# Altium PCB B-60-30-B.PcbDoc (part 2 of 3)
Units mm, origin at the board's own origin, x right, y up, seen from the top; angles counter-clockwise.
Board outline 70.1 x 39.1 mm, 6 copper layers (Top Layer, G1, S1, S2, G2, Bottom Layer), stack 2.011 mm thick; 241 components, 129 nets, 632 pads, 875 vias.
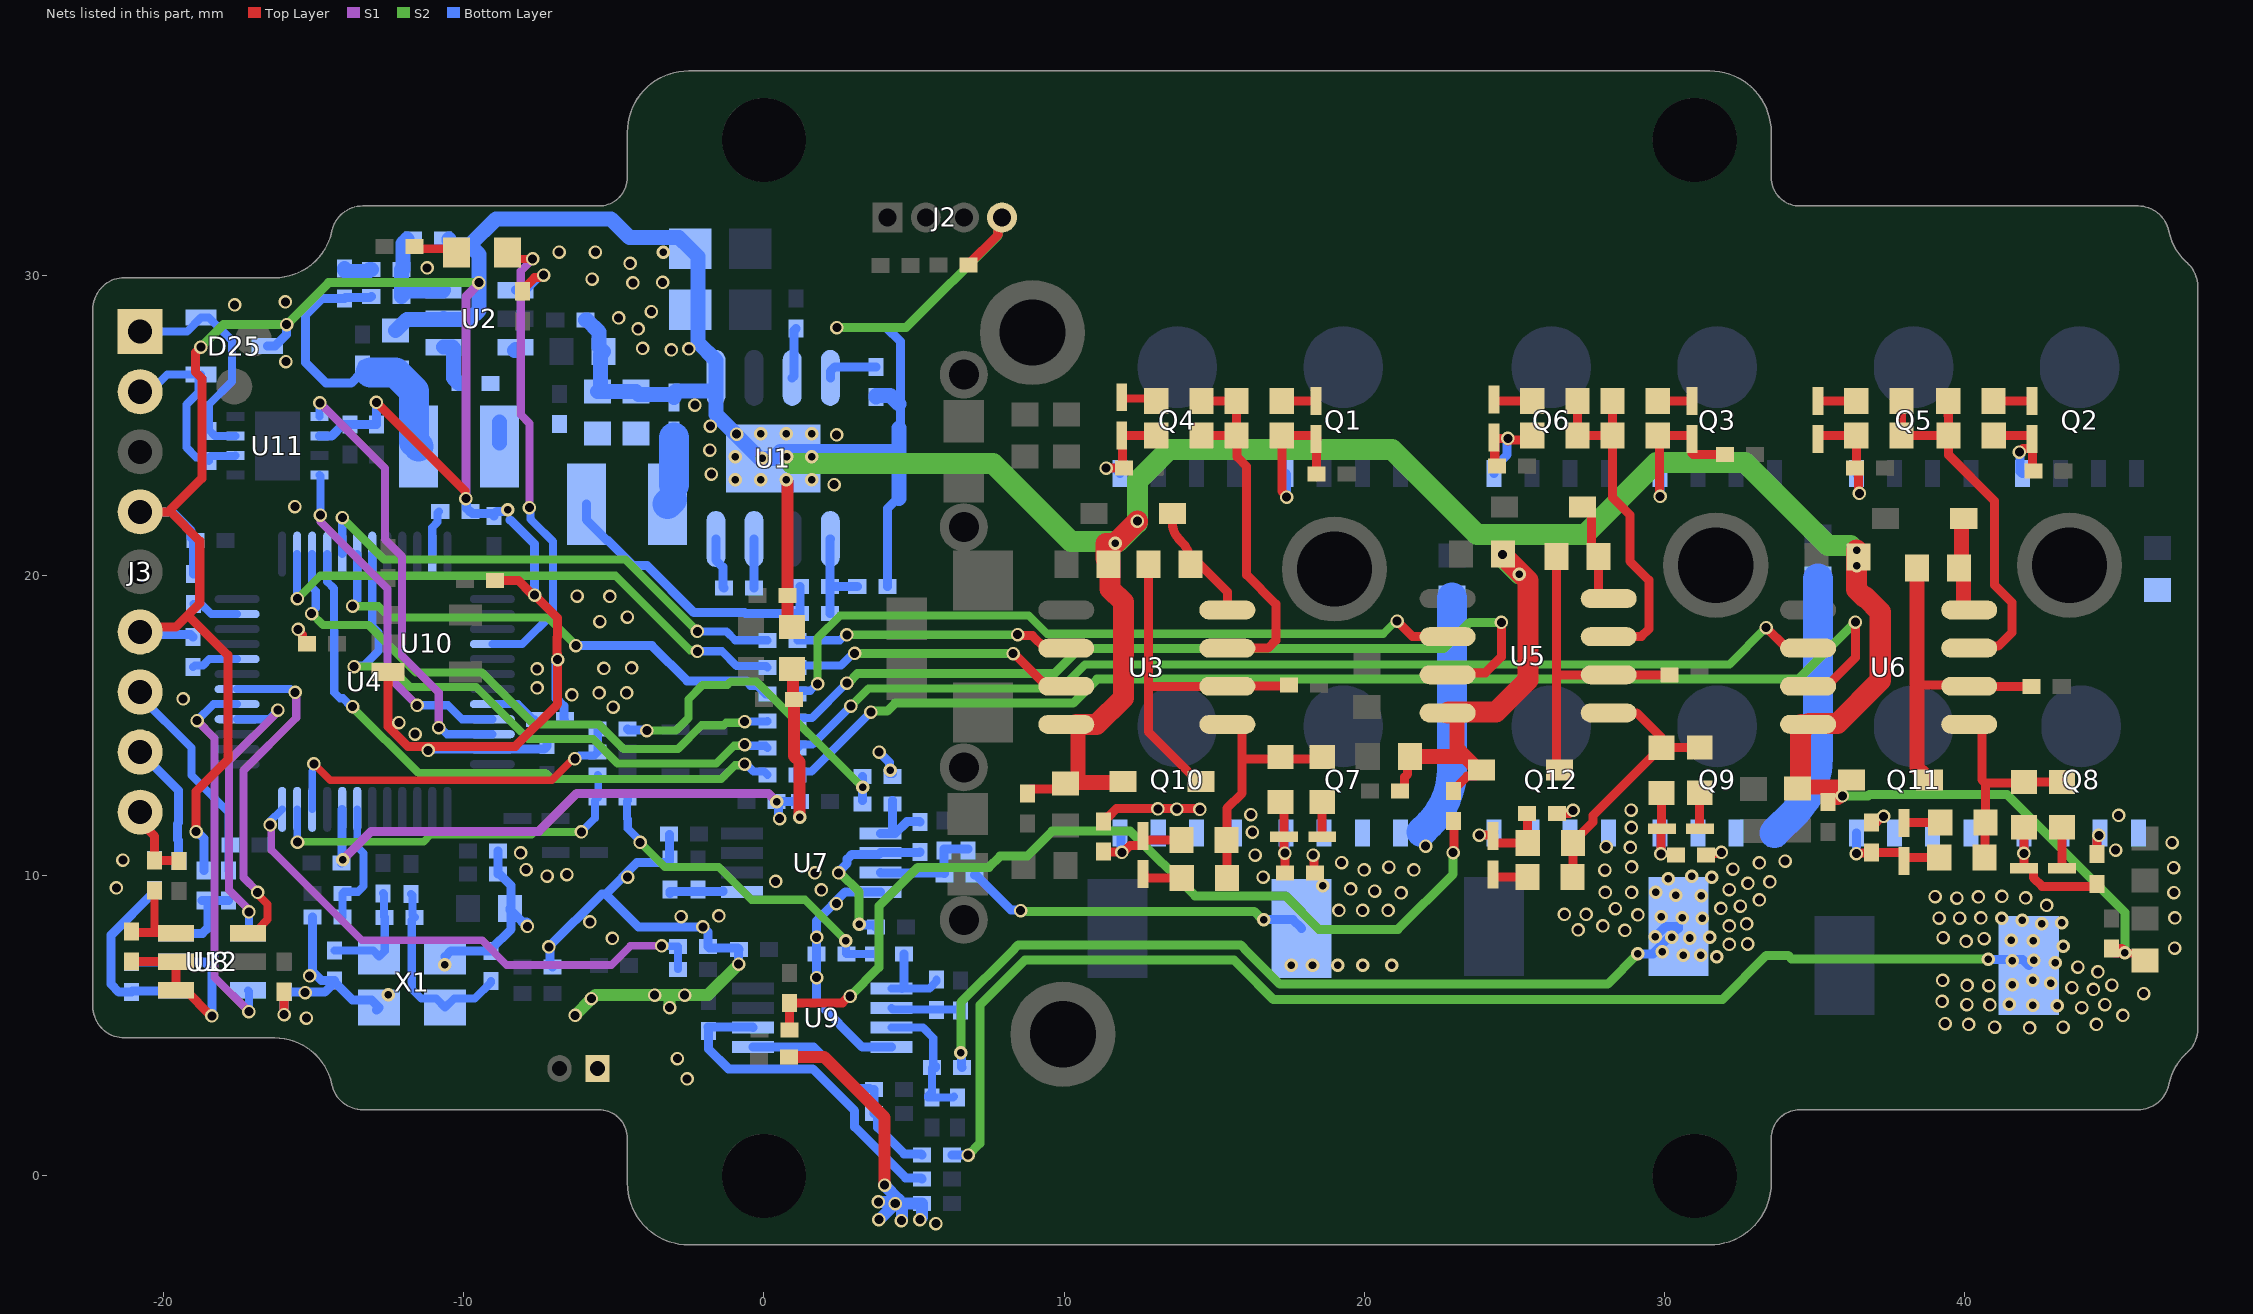
[diagram p6: the nets of this part, all layers, seen from the top]

## Via types
v1: diameter 0.45, hole 0.3, Top Layer to Bottom Layer, 450 vias
v2: diameter 0.45, hole 0.25, Top Layer to Bottom Layer, 425 vias

## Nets (pads, with @x,y where several pads share a name; then routed paths per layer and width w, separated by ;. In a path a pad name is that pad's centre, name@x,y a point inside that pad or via, vN(x,y) a via of type N, cw(c..) or ccw(c..) an arc to the next point about the centre after c; other vN are vias at no path point) (continued)
AGND: C22.2 C45.2 C47.1 C49.2 C50.1 C51.2 C55.2 C60.1 C61.1 C68.2 J4.1 L4.2 R77.2 U4.8 U7.4 U9.4 | length 52.4
  Top Layer w0.3: L4.2@0.94,16.88 L4.2@0.97,16.85 ; C68.2@0.97,15.89 C68.2@1,15.86
  Top Layer w0.4: C68.2@0.97,15.89 L4.2@0.97,16.85 ; C68.2@1,15.86 1,13.977 1.19,13.787 v2(1.19,11.941)
  S1 w0.3: v2(-14.022,10.525) -13.074,11.473 -7.498,11.473 -6.231,12.74 0.146,12.74 v2(0.425,12.461)
  S2 w0.3: v2(-14.022,10.525) v2@-14.013,10.525
  S2 w0.4: v1(-6.29,5.34) -6.29,5.35 -5.75,5.89 v1(-5.75,5.9) -5.736,5.9 -5.616,6.02 v1(-2.64,6.02) -1.87,6.02 v1(-0.84,7.05) ; v1(-3.14,5.6) -3.14,6.01
  Bottom Layer w0.3: C22.2@-14.07,10.41 C22.2@-14.07,10.51 ; U4.8@-14.045,12.207 -14.045,10.66 -14.07,10.635 C22.2@-14.07,10.51 ; v2(-14.022,10.525) -14.055,10.525 C22.2@-14.07,10.51 ; v1@-7.16,7.62 -7.131,7.591 -7.131,7.039 C47.1@-7.048,6.956 ; v1(-7.16,7.626) -5.401,9.385 -5.275,9.385 ; R77.2@-3.145,10.485 -3.193,10.437 -4.223,10.437 -5.275,9.385 ; R77.2@-3.145,10.555 C49.2@-3.145,11.375 ; v1(-0.84,7.05) -0.84,7.53 C55.2@-0.829,7.541 -0.876,7.588 -1.814,7.588 C60.1@-1.861,7.635 -1.861,8.114 v1(-2.037,8.29) -4.18,8.29 -5.275,9.385 ; v1(0.52,11.894) 0.491,11.923 0.491,12.395 v2(0.425,12.461) C51.2@1.203,12.461 ; v1(3.836,14.111) 4.175,13.771 4.175,13.4 C50.1@4.29,13.4 ; U7.4@3.876,9.454 2.714,9.454 1.753,8.493 C61.1@1.753,7.381 1.753,5.813 3.278,4.288 U9.4@4.243,4.288
  other v1: -2.56,3.23 -2.88,3.9 -3.64,6.02 1.753,6.597 -5.05,7.91 1.753,7.937 -5.8,8.46 -2.761,8.636 -1.5,8.66 2.411,9.062 1.91,9.52 0.39,9.809 -4.54,9.95 1.7,10.092
  other v2: 4.21,13.5
AH: R16.2 U4.29 | length 17.1
  S2 w0.27: v1(-14.04,21.92) -14.04,21.912 -12.654,20.526 -4.611,20.526 v1(-2.215,18.13)
  Bottom Layer w0.27: U4.29@-14.045,20.707 -14.045,21.915 v1(-14.04,21.92) ; v1(-2.215,18.13) -1.252,18.13 -0.957,17.835 0.118,17.835 R16.2@0.123,17.83
AL: R20.2 U4.26 | length 18.5
  S2 w0.27: v1(-15.54,19.22) -14.776,19.984 -4.937,19.984 -2.457,17.503 -2.249,17.503 v1(-2.215,17.469)
  Bottom Layer w0.27: v1@-15.545,19.424 U4.26@-15.545,20.707 ; v1(-2.215,17.469) -1.399,17.469 -0.911,16.981 0.078,16.981 R20.2@0.123,16.935
BH: R35.2 U4.30 | length 16.6
  S2 w0.27: v1(-13.7,18.97) -12.84,18.97 -12.46,18.59 -7.19,18.59 v1(-6.26,17.66)
  Bottom Layer w0.27: -13.545,19.174 U4.30@-13.545,20.707
  Bottom Layer w0.3: v1(-6.26,17.66) -3.73,17.66 -2.556,16.486 -0.592,16.486 -0.442,16.335 -0.222,16.335 0.073,16.041 R35.2@0.123,16.041
BL: R39.2 U4.27 | length 19.5
  S2 w0.27: v1(-15.06,18.72) -14.686,18.346 -13.166,18.346 -11.584,16.764 -9.384,16.764 -7.654,15.034 -5.495,15.034 -4.677,14.216 -2.864,14.216 -2.076,15.004 -1.656,15.004 -1.346,15.004 -1.262,15.088 -0.673,15.088 v1(-0.639,15.123)
  Bottom Layer w0.27: v1(-15.06,18.72) -15.06,18.769 -14.926,18.903 -14.926,19.474 -15.045,19.593 U4.27@-15.045,20.707 ; v1(-0.639,15.123) -0.627,15.134 0.111,15.134 R39.2@0.123,15.146
CA: C30.2 Q7.3 Q10.3 R73.1 R104.2 R108.2 Rs1.1 | length 23.8
  Top Layer w0.3: R104.2@11.31,11.8 11.31,11.85 11.41,11.95 11.46,11.95 11.75,12.24 13.101,12.24 v1(13.12,12.221) ; v1@13.12,12.24 v1@14.52,12.24 ; v1(18.29,10.68) 18.319,10.651 18.319,10.111 R108.2@18.35,10.08
  S2 w0.3: v1(8.552,8.829) 8.572,8.809 16.324,8.809 16.601,8.532 v2(16.642,8.532)
  Bottom Layer w0.3: R73.1@7.01,10.02 7.06,10.02 8.232,8.848 8.533,8.848 v1(8.552,8.829) ; v2(16.642,8.532) 17.618,8.532 Rs1.1@17.91,8.24
  Bottom Layer w1: 21.896,11.445 22.168,11.717 ccw(c20.372,13.513) 22.912,13.513 C30.2@22.912,19.254
  other v1: 19.15,8.839 19.94,8.839 20.79,8.839 21.22,9.42 20.34,9.48 19.54,9.56 16.625,9.948 19.99,10.19 21.65,10.19 20.81,10.28 19.24,10.43 16.36,10.68 22.04,10.98 16.27,11.45 16.22,12.03 13.75,12.21 14.52,12.2
  other v2: 17.56,7.009 18.27,7.009 19.11,7.009 19.94,7.009 20.91,7.009 18.61,9.66
CANH: D25.2 J3.1 R97.2 U11.7 | length 7.8
  Bottom Layer w0.27: J3.1@-20.776,28.113 -19.216,28.113 D25.2@-18.744,28.585 -18.491,28.585 -17.72,27.814 -17.72,26.45 -18.49,25.68 -18.49,24.849 -18.279,24.638 U11.7@-17.601,24.638
CANL: D25.1 J3.2 R97.1 U11.6 | length 6.8
  Bottom Layer w0.27: J3.2@-20.776,26.113 -20.443,26.113 -19.871,26.685 D25.1@-18.744,26.685 -18.83,26.599 -18.83,26.09 -19.23,25.69 -19.23,24.25 -18.91,23.93 -18.605,23.93 -18.49,23.815 R97.1@-18.49,23.81 ; R97.1@-18.49,23.899 -18.416,23.973 -17.616,23.973 U11.6@-17.601,23.988
CANRX: U4.45 U11.4 | length 11.7
  S1 w0.27: v1(-14.77,22) -14.77,21.782 -12.54,19.552 -12.54,16.66 v1(-11.55,15.67)
  Bottom Layer w0.27: U11.4@-14.8,23.338 -14.77,23.307 v1(-14.77,22) ; v1(-11.55,15.67) -10.521,15.67 -10.058,15.207 U4.45@-9.045,15.207
CANTX: U4.46 U11.1 | length 14.7
  S1 w0.27: v1(-14.79,25.74) -12.616,23.566 -12.616,21.187 -12.06,20.631 -12.06,17.32 -10.83,16.09 v1(-10.83,14.93)
  S2 w0.27: v1(-10.83,14.93) v1@-10.83,14.968
  Bottom Layer w0.27: U11.1@-14.801,25.288 -14.795,25.293 v1@-14.795,25.61 ; v1(-10.83,14.93) -10.781,14.93 -10.558,14.707 U4.46@-9.045,14.707
CB: C34.2 Q9.3 Q12.3 R93.1 R103.2 R109.2 Rs3.1 | length 39.3
  Top Layer w0.3: R103.2@26.41,12.06 26.832,12.06 v1(26.946,12.174) ; R103.2@26.46,12.13 R103.2@26.47,12.12 ; R109.2@31.38,10.69 31.431,10.741 31.861,10.741 v1(31.89,10.77)
  S2 w0.3: v2(6.561,4.1) 6.561,5.773 8.238,7.45 8.478,7.69 15.872,7.69 16.112,7.45 17.182,6.38 28.1,6.38 v2(29.11,7.39)
  Bottom Layer w0.3: v2(6.561,4.1) 6.581,4.081 6.581,3.619 R93.1@6.6,3.6 ; v2(29.11,7.39) 29.603,7.39 30.453,8.24 Rs3.1@30.453,8.3 30.02,8.3 v2(29.68,7.96)
  Bottom Layer w1: Q9.3@33.651,11.421 34.36,12.13 ccw(c32.564,13.926) 35.104,13.926 C34.2@35.104,19.889
  other v1: 32.15,7.71 32.76,7.72 28.67,8.17 27.12,8.19 27.94,8.32 32.15,8.32 32.73,8.39 26.66,8.71 27.38,8.71 29.11,8.69 28.36,8.9 31.87,8.91 32.52,8.98 33.15,9.19 28.02,9.44 28.9,9.44 32.15,9.53 32.77,9.74 33.5,9.79 28.01,10.18 32.27,10.21 28.9,10.29 33.15,10.42 34.01,10.48 28.86,10.94 28.05,10.96 28.89,11.6 28.88,12.18
  other v2: 31.74,7.29 31.2,7.34 30.62,7.35 29.92,7.47 30.84,7.92 30.23,7.94 31.5,7.95 31.25,8.57 30.59,8.59 29.89,8.62 30.36,9.34 31.21,9.33 29.71,9.44 30.12,9.89 31.57,9.95 30.9,9.98
CC: C32.2 Q8.3 Q11.3 R92.1 R102.2 R110.2 Rs2.1 | length 43.7
  Top Layer w0.3: R102.2@36.98,11.77 37.049,11.77 37.249,11.97 v1(37.29,11.97) ; R110.2@44.451,10.659 R110.2@44.39,10.72 R110.2@44.39,10.72 44.391,11.23 44.46,11.299 v1(44.46,11.34)
  S2 w0.3: v1(6.8,0.69) 7.19,1.08 7.19,5.681 8.449,6.94 8.689,7.18 15.661,7.18 15.901,6.94 16.971,5.87 31.92,5.87 33.389,7.339 34.111,7.339 34.23,7.22 40.76,7.22 v2(40.77,7.21)
  Bottom Layer w0.3: R92.1@6.27,0.69 v1(6.8,0.69) ; v2(40.77,7.21) 41.916,7.21 Rs2.1@42.126,7
  other v1: 40.99,4.95 42.15,4.93 43.27,4.95 40.12,5.04 44.38,5.04 39.34,5.07 45.26,5.34 43.89,5.6 40.83,5.69 40.06,5.7 44.66,5.7 39.24,5.81 45.95,6.07 44.28,6.21 43.56,6.27 40.07,6.34 40.8,6.33 44.89,6.35 39.26,6.51 44.43,6.79 43.76,6.95 46.98,7.58 40.04,7.81 40.64,7.9 39.27,7.93 39.14,8.58 39.82,8.58 40.53,8.59 46.99,8.59 42.72,9.01 39.73,9.25 42.02,9.26 40.45,9.29 39.01,9.3 41.23,9.31 46.96,9.43 46.95,10.26 45.02,10.85 46.9,11.1 45.12,12
  other v2: 42.26,5.68 43.08,5.67 41.47,5.71 41.58,6.37 42.85,6.42 42.26,6.52 43,7.09 41.58,7.17 42.29,7.18 43.27,7.64 41.55,7.85 42.27,7.83 42.56,8.39 43.23,8.43 41.91,8.51 41.22,8.58
CH: R52.2 U4.31 | length 19.8
  S2 w0.27: v1(-13.65,16.96) -12.459,16.96 -11.783,16.284 -9.583,16.284 -7.853,14.554 -5.694,14.554 -4.872,13.732 -1.589,13.732 -0.997,14.325 -0.673,14.325 v1(-0.639,14.359)
  Bottom Layer w0.27: v1(-13.65,16.96) -13.616,16.994 -13.319,16.994 -12.836,17.478 -12.836,18.104 -13.045,18.313 U4.31@-13.045,20.707 ; v1(-0.639,14.359) -0.605,14.325 0.049,14.325 R52.2@0.123,14.251
CL: R54.2 U4.28 | length 20.7
  S2 w0.27: v1(-13.698,15.626) -13.698,15.598 -11.51,13.41 -7.27,13.41 -7.08,13.22 -1.422,13.22 -0.968,13.675 -0.673,13.675 v1(-0.639,13.709)
  Bottom Layer w0.27: U4.28@-14.545,20.707 -14.545,19.786 -14.314,19.555 -14.314,18.144 -14.31,18.14 -14.31,16.095 -14.119,15.905 -14.025,15.905 -13.746,15.626 v1(-13.698,15.626) ; v1(-0.639,13.709) -0.59,13.709 -0.352,13.471 0.008,13.471 R54.2@0.123,13.356
GND: C2.2 C3.2 C6.2 C12.1 C14.1 C16.2 C17.2 C19.2 C20.1 C21.1 C24.2 C25.2 C26.2 C27.2 C28.2 C29.2 C36.2 C38.1 C39.1 C40.2 C41.1 C43.1 C44.1 C46.1 C52.1 C53.1 C54.2 C56.2 C59.2 C62.2 C63.2 C64.2 C65.2 C66.2 C67.2 D2.1 D7.1 D15.1 D20.1 D25.3 J2.4 J3.4 J3.6 L4.1 R6.1 R9.1 R10.2 R11.1 R33.2 R50.2 R59.2 R64.1 R65.1 R78.1 R79.1 R88.2 Rt1.1 U1.1 U1.9 U2.2 U3.4 U4.47 U5.4 U6.4 U8.2 U10.3 U11.2 U12.2 U12.3 X1.2 X1.4 | length 270.6
  Top Layer w0.27: C53.1@44.995,7.405 45.755,7.405 R79.1@45.99,7.17
  Top Layer w0.3: C66.2@-21.055,7.135 -21.051,7.131 -19.592,7.131 U12.2@-19.588,7.127 U12.3@-19.588,6.177 -19.263,6.177 -18.416,5.33 v1(-18.39,5.33) ; J3.6@-20.776,18.113 -20.605,18.284 -19.576,18.284 -19.183,18.677 ; J3.4@-20.776,22.113 -19.837,22.113 ; v1(-18.91,11.46) -18.91,12.8 -17.85,13.86 -17.85,17.344 -19.183,18.677 ; v1(-18.75,27.6) -18.93,27.42 -18.93,26.77 -18.72,26.56 -18.72,23.23 -19.837,22.113 ; v1(-15.98,5.37) C65.2@-15.98,6.13 ; v1(-15.51,18.2) -15.51,18.159 -15.37,18.019 -15.37,17.82 -15.27,17.72 R88.2@-15.22,17.72 ; v1(-12.91,25.76) -9.959,22.809 ; U10.3@-12.528,16.78 -12.528,14.968 -11.861,14.301 -8.279,14.301 -6.87,15.71 v1(-6.87,17.19) -6.87,17.38 -6.889,17.399 -6.889,17.921 -6.87,17.94 -6.87,18.57 v1(-7.64,19.34) -7.71,19.41 -7.76,19.41 -8.18,19.83 C56.2@-8.96,19.83 ; R59.2@6.73,30.33 6.78,30.33 7.796,31.346 7.796,31.786 J2.4@7.93,31.92 ; C43.1@8.876,12.89 R64.1@9.869,12.89 ; R64.1@10.289,12.89 R64.1@10.466,13.067 ; C44.1@21.19,12.82 21.24,12.82 21.34,12.92 21.34,13.28 21.44,13.38 R65.1@21.44,13.85 ; Rt1.1@22.97,12.81 22.97,12.86 23.42,13.31 23.698,13.31 D15.1@23.898,13.51 ; -19.837,22.113 -19.763,22.113 -18.79,21.14 -18.79,19.07 -19.183,18.677
  Top Layer w0.4: v2(0.743,23.18) 0.743,23.166 0.79,23.12 C67.2@0.79,19.33 0.79,18.43 L4.1@0.94,18.28 ; C46.1@0.838,3.96 2,3.96 4.02,1.94 v1(4.02,-0.31) ; C52.1@35.44,12.45 35.44,12.5 35.49,12.55 35.77,12.55 35.87,12.65 v1(35.92,12.65) ; C53.1@44.88,7.57 44.923,7.527 45.219,7.527 45.316,7.43 v2(45.33,7.43)
  Top Layer w0.5: U3.4@10.07,15.034 U3.4@10.406,15.034 ; U3.4@10.466,14.92 10.466,13.129 10.497,13.098 11.929,13.098 D7.1@11.96,13.129 ; R65.1@21.44,13.85 21.56,13.97 23.338,13.97 ; U5.4@22.77,15.415 23.02,15.415 23.08,15.355 23.08,14.228 23.338,13.97 ; D15.1@23.798,13.51 23.338,13.97 ; R78.1@34.54,12.95 35.44,12.95 ; C52.1@35.44,12.5 35.44,12.95 ; D20.1@35.78,12.95 35.44,12.95
  Top Layer w0.7: U3.4@10.406,15.034 11.084,15.034 11.97,15.92 11.97,19.11 11.532,19.548 11.532,20.318 C19.2@11.482,20.368 11.532,20.418 11.39,20.56 11.39,21.06 v2(11.7,21.06) v1(12.44,21.8) ; U5.4@22.77,15.415 22.805,15.45 24.38,15.45 25.44,16.51 25.44,19.83 C36.2@24.61,20.66 ; R78.1@34.42,12.9 34.47,12.9 34.52,12.95 34.52,15 U6.4@34.555,15.035 ; U6.4@34.778,15.035 34.813,15.07 35.76,15.07 37.179,16.489 37.179,18.783 36.693,19.269 36.641,19.269 36.39,19.52 v2(36.39,20.84)
  S1 w0.3: v1(-9.93,22.55) -9.93,29.268 -9.49,29.708 v1(-9.49,29.749)
  S2 w0.3: v1(-18.75,27.6) -18,28.35 v1(-15.9,28.35) -14.501,29.749 v1(-9.49,29.749) ; v1(2.43,28.25) 4.73,28.25 7.796,31.316 7.796,31.786 J2.4@7.93,31.92 ; v1(35.92,12.65) 36.766,12.65 36.82,12.704 41.396,12.704 45.33,8.77 v2(45.33,7.43)
  S2 w0.7: 0.933,23.72 1.59,23.72 7.63,23.72 10.23,21.12 11.81,21.12 v1@12.44,21.75 ; v1(12.44,21.8) 12.44,23.14 13.49,24.19 20.92,24.19 23.75,21.36 27.34,21.36 29.73,23.75 32.68,23.75 35.44,20.99 36.19,20.99 36.39,20.79 36.39,19.86 ; 24.59,21.29 24.59,20.61 v2(25.16,20.04)
  Bottom Layer w0.27: R50.2@-6.66,15.19 R50.2@-6.62,15.19
  Bottom Layer w0.3: C62.2@-21.055,7.119 -21.051,7.123 -19.592,7.123 U8.2@-19.588,7.127 -19.581,7.12 -18.62,7.12 -18.38,6.88 -18.38,5.34 v1(-18.39,5.33) ; J3.6@-20.776,18.113 -20.69,18.027 -19.096,18.027 R33.2@-19.01,17.94 ; J3.4@-20.776,22.113 -19.713,22.113 -19.08,21.48 -19.08,21.26 -18.98,21.16 C24.2@-18.93,21.16 ; C28.2@-19,20.05 -19,21.06 -18.99,21.07 -18.93,21.07 C24.2@-18.86,21.14 ; v1(-18.91,11.46) -18.87,11.46 -18.651,11.241 C54.2@-18.651,10.167 ; D25.3@-16.541,27.635 -16.289,27.635 -15.9,28.024 v1(-15.9,28.35) ; v1(-15.98,5.37) -15.978,5.373 -15.978,6.117 C59.2@-15.975,6.119 -14.63,6.119 C41.1@-14.299,6.45 ; C39.1@-15.042,8.625 -15.042,6.812 -14.73,6.5 C41.1@-14.299,6.5 C41.1@-14.299,6.45 ; U11.2@-14.801,24.638 -14.402,24.638 -14.016,25.024 C64.2@-13.791,25.024 C63.2@-12.902,25.024 -12.902,25.752 v1(-12.91,25.76) ; X1.2@-12.902,5.517 X1.2@-12.816,5.603 -13.073,5.86 -13.709,5.86 C41.1@-14.299,6.45 ; v1@-11.18,14.207 U4.47@-9.045,14.207 -7.32,14.207 -7.22,14.307 C20.1@-7.22,14.35 C20.1@-7.22,14.4 ; X1.4@-10.616,7.303 -10.427,7.492 C38.1@-9.092,7.492 -9.092,7.542 -8.42,8.214 C27.2@-8.42,8.826 ; v1(-9.93,22.55) -9.901,22.521 -9.901,22.23 -9.801,22.13 C29.2@-9.78,22.13 -9.704,22.054 -9.068,22.054 C25.2@-8.992,21.978 -8.992,22.028 -8.892,22.128 -8.633,22.128 -8.571,22.19 v2(-8.53,22.19) ; C21.1@-8.854,10.81 C26.2@-8.854,10.048 -8.804,10.048 -8.43,9.674 -8.43,8.929 C27.2@-8.454,8.905 -8.454,8.86 C27.2@-8.42,8.826 ; -8.451,21.849 -7.64,21.038 v1(-7.64,19.34) ; v1(-7.879,8.311) -7.879,8.43 -7.904,8.455 -8.054,8.455 -8.42,8.821 C27.2@-8.42,8.826 ; v1(-6.87,17.19) -6.87,17.18 -6.92,17.13 -6.92,15.9 -6.66,15.64 R50.2@-6.66,15.19 ; v1(2.43,28.25) 4.08,28.25 4.55,27.78 4.55,24.963 4.5,24.913 ; R11.1@4.108,19.62 4.108,22.218 4.45,22.56 4.5,22.56
  Bottom Layer w0.4: v1(3.81,-0.87) 3.82,-0.88 4.31,-0.88 4.36,-0.93 v1(4.374,-0.93) ; v1(3.83,-1.46) 3.844,-1.46 v1(4.374,-0.93) ; v1(4.02,-0.31) 4.02,-0.324 4.493,-0.796 4.493,-0.92 4.383,-0.92 v1(4.374,-0.93) ; v1(4.58,-1.49) 4.6,-1.47 4.6,-0.93 R9.1@5.27,-0.93 5.259,-0.941 5.259,-1.391 v1(5.19,-1.46)
  Bottom Layer w0.5: C6.2@-12.267,28.147 -11.889,28.525 -10.695,28.525 U2.2@-10.67,28.55 -10.645,28.525 -9.783,28.525 -9.49,28.818 v1(-9.49,29.749) -9.49,30.68 -9.803,30.993 ; R10.2@-10.481,31.193 -10.481,31.143 -10.331,30.993 -9.803,30.993 ; C3.2@-5.95,28.51 -5.9,28.51 -5.494,28.104 -5.494,27.597 C2.2@-5.344,27.447 -5.44,27.351 -5.44,26.211 C16.2@-5.536,26.115 C17.2@-4.266,26.115 -4.17,26.019 -3.066,26.019 D2.1@-2.996,25.949 ; D2.1@-2.996,25.923 D2.1@-2.996,25.949 ; R6.1@3.74,25.94 3.74,25.99 4.207,25.99 4.5,25.697 ; 4.5,22.56 4.5,24.129 ; 4.5,24.913 4.5,24.129 ; -9.803,30.993 -8.927,31.869 -5.09,31.869 -4.474,31.253 -2.833,31.253 C12.1@-2.456,30.876 -2.203,30.623 -2.203,27.76 -1.599,27.156 U1.1@-1.599,26.574 U1.1@-1.599,26.198 ; D2.1@-2.996,25.949 -2.996,26.068 -2.926,26.138 -1.659,26.138 U1.1@-1.599,26.198 ; U1.1@-1.599,26.198 -1.599,25.351 -0.139,23.891 U1.9@0.306,23.891 0.544,24.129 4.5,24.129
  other v1: 5.73,-1.59 -15.24,5.25 -15.28,6.1 -15.13,6.66 -21.57,9.59 -7.22,9.98 -6.56,10.03 -7.92,10.2 -21.35,10.51 -8.1,10.752 -11.18,14.17 -11.62,14.71 -12.16,15.09 -5.02,15.61 -19.34,15.88 -6.395,16.017 -5.49,16.08 -4.57,16.08 -7.55,16.25 -7.55,16.88 -5.33,16.9 -4.41,16.92 -5.46,18.46 -4.55,18.61 -5.13,19.3 -6.22,19.31 24.59,20.69 -15.62,22.29 2.34,23.02 -1.75,23.37 -1.8,24.17 2.42,24.68 -0.91,24.701 -1.78,24.97 -2.3,25.67 -15.92,27.12 -3.08,27.51 -4.04,27.56 -2.5,27.54 -4.19,28.21 -4.84,28.57 -3.75,28.78 -17.63,29.01 -15.94,29.11 -4.363,29.743 -3.377,29.759 -5.72,29.86 -11.22,30.24 -4.46,30.39 -6.82,30.761 -5.61,30.761
  other v2: -12.51,6.03 -10.63,7.021 36.39,20.325 -0.95,23.18 -0.103,23.18 1.59,23.18 -0.05,23.89 -0.95,23.94 0.76,23.94 1.59,23.94 -0.103,24.72 0.743,24.72 1.59,24.72 -3.36,30.761
HA: R14.1 R22.1 R25.1 R28.1 U3.7 | length 12.6
  Top Layer w0.3: R28.1@14.572,24.66 R22.1@15.741,24.66 ; R25.1@14.572,25.803 R14.1@15.741,25.803 R22.1@15.741,24.66 ; U3.7@15.434,17.574 16.794,17.574 17.05,17.83 17.05,19.04 16.08,20.01 16.08,23.62 15.76,23.94 15.76,24.641 R22.1@15.741,24.66
HB: R17.1 R24.1 R27.1 R30.1 U5.7 | length 11.8
  Top Layer w0.3: R27.1@27.094,25.803 R30.1@27.094,24.66 R24.1@28.237,24.66 ; U5.7@28.134,17.955 28.143,17.964 29.225,17.964 29.471,18.21 29.471,19.839 28.84,20.47 28.84,22.01 28.263,22.587 R24.1@28.263,24.66 R17.1@28.263,25.803
HC: R15.1 R23.1 R26.1 R29.1 U6.7 | length 12.4
  Top Layer w0.3: R26.1@37.889,25.803 R29.1@37.889,24.66 R23.1@39.448,24.66 ; 39.444,25.321 39.448,25.317 R23.1@39.448,24.66 ; U6.7@40.142,17.575 40.206,17.638 41.108,17.638 41.56,18.09 41.56,19.1 40.98,19.68 40.98,22.48 39.452,24.008 R23.1@39.452,24.66 R23.1@39.448,24.66
HLA: J3.7 R80.1 R82.2 | length 7.2
  Bottom Layer w0.27: J3.7@-20.776,16.113 -20.776,15.964 -19.07,14.258 -19.07,13.34 -17.826,12.096 R82.2@-17.826,10.167 R82.2@-17.82,10.174
HLA1: U4.16 U8.4 | length 9.9
  S1 w0.27: v1(-17.15,8.79) -17.15,8.86 -17.814,9.524 -17.814,13.833 -16.19,15.457 v1(-16.19,15.51)
  Bottom Layer w0.27: U4.16@-17.545,15.207 -16.488,15.207 -16.187,15.508 v1(-16.19,15.51) v1(-16.19,15.51) ; U8.4@-17.188,8.077 -17.08,8.185 -17.15,8.255 v1(-17.15,8.79)
HLB: J3.8 R87.2 R91.2 | length 4.9
  Bottom Layer w0.27: R91.2@-20.3,10.487 R87.2@-19.604,10.487
  Bottom Layer w0.3: J3.8@-20.776,14.113 -19.499,12.836 -19.499,11.761 -19.539,11.721 -19.539,11.2 -19.499,11.16 -19.499,10.511 R87.2@-19.475,10.487
HLB1: U4.17 U8.6 | length 12.7
  S1 w0.27: v1(-18.88,15.16) -18.294,14.574 -18.294,6.614 v1(-17.15,5.47)
  Bottom Layer w0.27: v1(-18.88,15.16) -18.333,15.707 U4.17@-17.545,15.707 ; U8.6@-17.188,6.177 -17.15,6.139 v1(-17.15,5.47)
HLC: J3.9 R96.2 R98.2 | length 2.6
  Top Layer w0.3: J3.9@-20.776,12.113 -20.776,11.788 -20.293,11.305 R98.2@-20.293,10.5 R96.2@-19.48,10.5
HLC1: U4.18 U12.6 | length 11.5
  Top Layer w0.27: U12.6@-17.188,8.077 -16.863,8.077 -16.86,8.08 -16.86,8.212 -16.536,8.536 -16.536,9.044 -16.86,9.368 v1(-16.86,9.44)
  S1 w0.27: v1(-16.86,9.44) -16.86,9.459 -17.334,9.933 -17.334,13.498 -15.576,15.256 -15.576,15.269 -15.576,16.066 v1(-15.61,16.1)
  Bottom Layer w0.27: U4.18@-17.545,16.207 -15.766,16.207 -15.659,16.1 v1(-15.61,16.1)
IA: C50.2 R12.2 R71.2 | length 11.2
  S2 w0.27: v1(-3.9,14.83) -2.929,14.83 -2.514,15.245 -2.514,15.872 -2.041,16.345 -1.22,16.345 -1.101,16.464 -0.244,16.464 3.281,12.939 v2(3.29,12.939)
  Bottom Layer w0.3: R12.2@-4.536,14.874 -4.514,14.852 -3.922,14.852 v1(-3.9,14.83) ; R71.2@3.28,12.5 3.28,12.87 3.29,12.88 v2(3.29,12.939) ; v2@3.285,12.905 C50.2@3.285,13.295
IB: C61.2 R18.2 R90.1 | length 11.2
  S2 w0.27: v1(-4.12,11.106) -3.304,10.29 -1.505,10.29 -0.41,9.195 1.365,9.195 v2(2.73,7.83)
  Bottom Layer w0.27: R18.2@-4.536,12.588 -4.536,12.495 -4.558,12.473 -4.558,11.897 -4.536,11.875 -4.536,11.571 -4.12,11.155 v1(-4.12,11.106) ; v2(2.73,7.83) 2.73,7.404 C61.2@2.753,7.381 R90.1@3.658,7.381
IC: C60.2 R89.2 U4.12 | length 17.7
  S1 w0.254: v1(-16.45,11.69) -16.412,11.653 -16.412,10.853 -13.4,7.84 -9.38,7.84 -8.56,7.02 -5.083,7.02 -4.442,7.661 v1(-3.41,7.661)
  Bottom Layer w0.254: v1(-16.45,11.69) -16.45,11.802 U4.12@-16.045,12.207 ; v1(-3.41,7.661) -3.397,7.648 -2.874,7.648 C60.2@-2.861,7.635 R89.2@-2.861,6.873
LA: R31.1 R37.1 R41.1 R45.1 U3.5 | length 8.3
  Top Layer w0.3: R45.1@15.41,11.191 15.415,11.187 15.415,9.925 R41.1@15.419,9.921 R41.1@15.429,9.911 ; R45.1@15.419,11.36 15.419,12.24 15.927,12.748 15.927,13.882 ; U3.5@15.434,15.034 15.927,15.034 15.927,13.882 ; R31.1@18.594,13.882 17.197,13.882 15.927,13.882
LB: R34.1 R40.1 R44.1 R47.1 U5.5 | length 9.3
  Top Layer w0.3: R44.1@26.933,9.95 26.938,9.955 26.938,11.075 R47.1@26.943,11.08 26.943,11.109 27.61,11.775 27.61,11.997 29.868,14.255 R40.1@29.897,14.255 ; U5.5@28.134,15.415 29.065,15.415 29.897,14.583 R40.1@29.897,14.255 ; R34.1@31.167,14.263 31.163,14.259 29.901,14.259 R40.1@29.897,14.255
LC: R32.1 R38.1 R42.1 R46.1 U6.5 | length 7.1
  Top Layer w0.3: U6.5@40.453,15.034 40.565,14.923 40.565,13.195 40.683,13.077 ; R46.1@40.653,10.6 40.668,10.615 40.668,11.755 R42.1@40.683,11.77 40.683,12.947 40.683,13.077 ; R32.1@43.232,13.112 R38.1@41.962,13.112 41.927,13.077 40.683,13.077
LED: LED1.2 U4.40 | length 15.8
  Top Layer w0.27: LED1.2@-8.535,30.749 -8.326,30.54 v1(-7.7,30.54)
  S1 w0.27: v1(-7.81,22.25) -7.81,25.06 -8.1,25.35 -8.1,30.14 v1(-7.7,30.54)
  Bottom Layer w0.27: U4.40@-9.045,17.707 -8.048,17.707 -7.026,18.729 -7.026,21.124 -7.665,21.763 -7.776,21.874 -7.776,22.216 v1(-7.81,22.25)
NetC1_1: C1.1 D2.2 L2.1 U1.8 | length 3.5
  Bottom Layer w0.3: U1.8@-1.599,21.209 -1.599,20.502 -1.37,20.273 -1.37,19.606 C1.1@-1.337,19.573
  Bottom Layer w1: L2.1@-3.217,22.367 L2.1@-3.067,22.517 ; L2.1@-2.996,23 D2.2@-2.996,24.59
NetC1_2: C1.2 U1.7 | length 1.6
  Bottom Layer w0.3: C1.2@-0.337,19.573 -0.333,19.577 -0.333,21.205 U1.7@-0.329,21.209
NetC6_1: C6.1 C15.1 L1.2 R1.1 R3.1 | length 10.3
  Bottom Layer w0.3: R1.1@-13.37,26.97 R1.1@-13.37,27.02 ; -13.1,26.75 -13.367,26.747 -13.403,26.747 -13.75,26.4 -14.58,26.4 -15.269,27.089 -15.269,28.661 -14.71,29.22 R3.1@-13.97,29.22 -13.936,29.254 -13.112,29.254 C15.1@-13.078,29.288
  Bottom Layer w1: -13.1,26.75 C6.1@-12.267,26.747 -11.65,26.13 -11.65,24.44 L1.2@-11.5,24.29
NetC13_1: C13.1 L1.1 U2.6 | length 0.7
  Bottom Layer w0.5: L1.1@-8.805,24.399 L1.1@-8.805,25.109 ; U2.6@-8.302,27.488 -8.276,27.513 U2.6@-8.273,27.513
NetC13_2: C13.2 U2.1 | length 1.6
  Bottom Layer w0.5: U2.1@-10.67,27.6 -10.37,27.6 -10.345,27.575 -10.345,26.575 -10.16,26.39 C13.2@-10.11,26.39
NetC15_2: C15.2 R7.2 R10.1 U2.3 | length 3.5
  Bottom Layer w0.5: R10.1@-11.881,31.193 -12.028,31.046 -12.028,30.177 R7.2@-12.078,30.177 C15.2@-12.078,29.288 -11.891,29.475 -10.695,29.475 U2.3@-10.67,29.5
NetC16_1: C16.1 C17.1 C18.1 L2.2 R4.2 R8.2 | length 9.8
  Bottom Layer w0.3: L2.2@-5.917,22.367 -5.917,21.854 -5.22,21.157 -5.187,21.157 -4.35,20.32 -3.89,20.32 -2.329,18.759 -0.655,18.759 -0.621,18.725 R8.2@1.203,18.725 C18.1@1.203,19.62
NetC18_2: C18.2 R8.1 R11.2 U1.5 | length 3.4
  Bottom Layer w0.3: R8.1@2.203,18.725 C18.2@2.203,19.62 ; U1.5@2.211,21.209 2.207,21.205 2.207,19.624 C18.2@2.203,19.62 ; R11.2@3.108,19.62 C18.2@2.203,19.62
NetC23_1: C23.1 D3.2 U3.8 | length 4.6
  Top Layer w0.3: D3.2@13.6,22.05 13.6,21.755 ccw(c14.385,21.755) 13.83,21.2 13.897,21.133 cw(c13.133,20.368) C23.1@14.214,20.368 14.512,20.368 15.434,19.446 U3.8@15.434,18.844 U3.8@14.906,18.844
NetC23_2: C23.2 D7.2 R19.2 U3.6 | length 12.5
  Top Layer w0.3: C23.2@12.814,20.368 12.814,16.33 ; D7.2@14.56,13.129 14.46,13.129 12.814,14.775 12.814,16.33 ; R19.2@17.324,16.312 17.32,16.308 15.438,16.308 U3.6@15.434,16.304 12.84,16.304 12.814,16.33
NetC28_1: C28.1 U4.23 | length 1.6
  Bottom Layer w0.27: C28.1@-19,19.05 -18.75,19.05 -18.407,18.707 U4.23@-17.545,18.707
NetC29_1: C29.1 U4.35 | length 1.5
  Bottom Layer w0.27: U4.35@-11.036,20.716 U4.35@-11.045,20.707 -11.045,21.595 -10.87,21.77 -10.87,22.08 C29.1@-10.82,22.13
NetC37_1: C37.1 D11.2 U5.8 | length 3.6
  Top Layer w0.3: D11.2@27.26,22.273 27.36,22.273 27.56,22.073 27.56,20.865 C37.1@27.803,20.622 27.803,19.377 27.955,19.225 U5.8@28.134,19.225
NetC37_2: C37.2 D15.2 R36.2 U5.6 | length 10.9
  Top Layer w0.3: C37.2@26.403,20.622 26.403,16.68 ; D15.2@26.498,13.51 26.403,13.605 26.403,16.68 ; R36.2@30.159,16.685 26.408,16.685 26.403,16.68
NetC38_2: C38.2 R43.2 R48.1 X1.1 | length 6.6
  Bottom Layer w0.27: R43.2@-11.75,9.39 -11.704,9.344 -11.704,8.684 R48.1@-11.63,8.61 -11.73,8.51 -11.73,6.218 -11.412,5.9 -10.913,5.9 X1.1@-10.616,5.603 -10.315,5.904 -9.63,5.904 -9.092,6.442 C38.2@-9.092,6.492
NetC39_2: C39.2 R49.2 U4.7 | length 4.2
  Bottom Layer w0.254: U4.7@-13.545,12.207 -13.545,10.952 -13.33,10.737 -13.33,10.696
  Bottom Layer w0.27: C39.2@-14.042,8.625 R49.2@-14.042,9.398 -13.979,9.46 -13.52,9.46 -13.33,9.65 -13.33,10.696
NetC41_2: C41.2 R48.2 R51.2 X1.3 | length 3.8
  Bottom Layer w0.27: C41.2@-14.299,7.5 -13.013,7.5 X1.3@-12.816,7.303 -12.63,7.489 R48.2@-12.63,8.61 -12.655,8.635 -12.655,9.385 R51.2@-12.68,9.41
NetC42_1: C42.1 D19.2 U6.8 | length 3.6
  Top Layer w0.5: D19.2@39.96,21.892 39.883,21.815 39.883,20.318 C42.1@39.806,20.241 39.956,20.091 39.956,18.904 40.016,18.844 U6.8@40.453,18.844
NetC42_2: C42.2 D20.2 R53.2 U6.6 | length 11.2
  Top Layer w0.3: 38.406,16.304 38.361,16.349 38.406,16.349 40.408,16.349 40.453,16.304 R53.2@42.224,16.304
  Top Layer w0.5: C42.2@38.406,20.241 38.406,16.349 38.406,16.304 38.406,13.594 38.62,13.38 38.62,13.28 38.72,13.18 D20.2@38.82,13.18
NetC48_2: C48.2 R73.2 R76.2 U7.3 | length 3.8
  Bottom Layer w0.3: U7.3@3.876,10.104 3.898,10.082 5.988,10.082 R73.2@6.005,10.065 ; R73.2@6.01,10.06 R73.2@6.005,10.065 ; R76.2@6.8,10.89 6,10.89 6.005,10.885 R73.2@6.005,10.065
NetC54_1: C54.1 R82.1 U8.3 | length 2.9
  Bottom Layer w0.3: U8.3@-19.588,8.077 -18.706,8.077 -18.515,8.268 C54.1@-18.515,9.167 ; C54.1@-18.715,9.167 R82.1@-17.826,9.167
NetC57_2: C57.2 R92.2 R94.2 U9.5 | length 7.6
  Bottom Layer w0.3: U9.5@-0.357,4.288 1.652,4.288 3.03,2.91 R94.2@3.51,2.91 ; R94.2@3.67,2.88 C57.2@3.67,2.08 3.688,2.08 3.788,1.98 3.788,1.612 4.672,0.728 5.232,0.728 R92.2@5.27,0.69
NetC58_2: C58.2 R93.2 R95.2 U9.3 | length 4.5
  Bottom Layer w0.27: U9.3@4.243,4.938 5.292,4.938 5.64,4.59 5.64,3.64 R93.2@5.625,3.625 ; R93.2@5.6,3.6 5.6,2.79 5.47,2.66 5.47,2.61 6.3,2.61 6.31,2.62 R95.2@6.325,2.635 ; R93.2@5.725,3.6 R93.2@5.725,3.655
NetC62_1: C62.1 R91.1 U8.1 | length 6
  Bottom Layer w0.3: R91.1@-20.3,9.51 -20.3,9.46 -21.74,8.02 -21.74,6.38 -21.48,6.12 -21.056,6.12 C62.1@-21.055,6.119 -21.026,6.148 -19.617,6.148 U8.1@-19.588,6.177
NetC66_1: C66.1 R98.1 U12.1 | length 2.9
  Top Layer w0.27: -20.321,8.106 -20.293,8.134 R98.1@-20.293,9.5
  Top Layer w0.3: C66.1@-21.055,8.135 -21.026,8.106 -20.321,8.106 -19.617,8.106 U12.1@-19.588,8.077
NetD4_1: D4.1 Q1.2 R22.2 R105.2 | length 5.3
  Top Layer w0.3: v1(17.41,22.6) 17.41,22.641 17.248,22.803 R22.2@17.248,24.66 18.361,24.66 18.361,24.6 D4.1@18.421,24.54 ; D4.1@18.391,24.533 18.4,24.524 18.4,23.389 R105.2@18.41,23.38
  Bottom Layer w0.3: Q1.2@17.39,23.383 17.41,23.363 v1(17.41,22.6)
NetD4_2: D4.2 R14.2 | length 1.1
  Top Layer w0.3: R14.2@17.248,25.803 D4.2@18.391,25.803
NetD5_1: D5.1 Q2.2 R23.2 R107.1 | length 3.7
  Top Layer w0.3: R23.2@40.959,24.66 42.199,24.66 42.229,24.63 D5.1@42.229,24.533 42.255,24.508 42.255,24.218 42.255,23.506 R107.1@42.28,23.48 ; v1(41.81,24.1) 41.928,24.218 42.199,24.218 D5.1@42.229,24.248
  Bottom Layer w0.3: v1(41.81,24.1) 41.839,24.071 41.839,23.456 Q2.2@41.911,23.383
NetD5_2: D5.2 R15.2 | length 1.3
  Top Layer w0.3: R15.2@40.95,25.803 D5.2@42.229,25.803
NetD6_1: D6.1 Q3.2 R24.2 R106.1 | length 5.2
  Top Layer w0.3: v1(29.85,22.63) 29.821,22.659 29.821,24.609 R24.2@29.77,24.66 30.883,24.66 30.913,24.63 D6.1@30.913,24.533 ; 30.913,24.05 30.943,24.02 R106.1@32.01,24.02
  Bottom Layer w0.3: Q3.2@29.841,23.383 29.85,23.374 v1(29.85,22.63)
NetD6_2: D6.2 R17.2 | length 1.1
  Top Layer w0.3: R17.2@29.77,25.803 D6.2@30.913,25.803
NetD8_1: D8.1 Q4.2 R28.2 R99.1 | length 3.1
  Top Layer w0.3: v1(11.4,23.57) R99.1@12,23.57 11.944,23.626 11.944,24.39 11.944,24.63 D8.1@11.914,24.66 12.49,24.66 R28.2@13.066,24.66
  Bottom Layer w0.3: Q4.2@11.686,23.56 Q4.2@11.863,23.383
NetD8_2: D8.2 R25.2 | length 1.2
  Top Layer w0.27: D8.2@11.914,25.93 11.959,25.885 12.984,25.885 R25.2@13.066,25.803
NetD9_1: D9.1 Q5.2 R29.2 R100.1 | length 4.1
  Top Layer w0.3: D9.1@35.104,24.533 35.104,24.63 35.134,24.66 R29.2@36.383,24.66 ; R29.2@36.381,24.669 36.381,23.57 36.451,23.5 36.451,22.759 v1(36.48,22.73)
  Bottom Layer w0.3: Q5.2@36.384,23.383 36.451,23.316 36.451,22.759 v1(36.48,22.73)
NetD9_2: D9.2 R26.2 | length 1.3
  Top Layer w0.3: D9.2@35.104,25.803 R26.2@36.383,25.803
NetD10_1: D10.1 Q6.2 R30.2 R101.1 | length 3.6
  Top Layer w0.3: D10.1@24.309,24.673 24.309,24.591 D10.1@24.34,24.56 ; D10.1@24.31,24.59 D10.1@24.34,24.56 ; D10.1@24.34,24.47 24.34,23.71 R101.1@24.41,23.64 ; v1@24.78,24.47 24.809,24.499 25.426,24.499 R30.2@25.588,24.66 ; v1(24.78,24.56) D10.1@24.34,24.56
  Bottom Layer w0.3: Q6.2@24.314,23.383 24.314,23.583 24.751,24.02 24.751,24.441 v1@24.78,24.47
NetD10_2: D10.2 R27.2 | length 1.3
  Top Layer w0.3: D10.2@24.309,25.803 R27.2@25.588,25.803
NetD12_1: D12.1 Q7.2 R37.2 R108.1 | length 3.1
  Top Layer w0.3: R37.2@17.197,12.376 17.321,12.251 D12.1@17.321,11.224 ; D12.1@17.324,11.224 D12.1@17.321,11.224 ; R108.1@17.35,10.08 v1(17.35,10.75) 17.321,10.779 D12.1@17.321,11.224
  Bottom Layer w0.3: v1(17.35,10.75) 17.35,11.461 Q7.2@17.39,11.421
NetD12_2: D12.2 R31.2 | length 1.1
  Top Layer w0.3: D12.2@18.594,11.294 R31.2@18.594,12.376
NetD13_1: D13.1 Q8.2 R38.2 R110.1 | length 4.7
  Top Layer w0.3: 41.96,10.464 v1(41.96,10.74) 41.96,11.603 R38.2@41.962,11.605 ; D13.1@41.965,10.245 42.25,10.245 42.28,10.215 42.28,9.93 42.568,9.642 44.312,9.642 R110.1@44.39,9.72
  Bottom Layer w0.3: v1(41.96,10.74) 41.96,11.419 Q8.2@41.962,11.421
NetD13_2: D13.2 R32.2 | length 1.1
  Top Layer w0.3: 43.232,10.462 R32.2@43.232,11.605
NetD14_1: D14.1 Q9.2 R40.2 R109.1 | length 2.8
  Top Layer w0.3: v1(29.87,10.72) 29.87,11.514 D14.1@29.912,11.556 29.897,11.571 R40.2@29.897,12.748
  Bottom Layer w0.3: Q9.2@29.841,11.421 29.869,11.393 v1(29.87,10.72) v1(29.87,10.72)
NetD14_2: D14.2 R34.2 | length 1.2
  Top Layer w0.3: R34.2@31.167,12.757 31.167,11.571 D14.2@31.182,11.556
NetD16_1: D16.1 Q10.2 R45.2 R104.1 | length 3.6
  Top Layer w0.3: R104.1@11.31,10.8 11.325,10.785 11.906,10.785 v1(11.92,10.77) ; v1@11.905,10.765 11.955,10.765 12.194,11.003 12.595,11.003 12.625,11.033 12.625,11.191 R45.2@13.904,11.191
  Bottom Layer w0.3: Q10.2@11.863,11.421 11.892,11.392 11.892,10.799 v1(11.92,10.77)
NetD16_2: D16.2 R41.2 | length 1.4
  Top Layer w0.3: D16.2@12.625,10.208 12.625,10.111 D16.2@12.655,10.081 ; D16.2@12.655,9.921 R41.2@13.912,9.921
NetD17_1: D17.1 Q11.2 R46.2 R102.1 | length 3.7
  Top Layer w0.3: v1(36.38,10.73) 36.4,10.75 36.96,10.75 36.98,10.77 37.94,10.77 37.97,10.74 D17.1@37.97,10.6 ; D17.1@37.97,10.48 D17.1@37.97,10.6 ; R46.2@39.147,10.6 D17.1@37.97,10.6
  Bottom Layer w0.3: v1(36.38,10.73) 36.382,10.732 36.382,11.419 Q11.2@36.384,11.421
NetD17_2: D17.2 R42.2 | length 1.2
  Top Layer w0.3: D17.2@37.97,11.77 R42.2@39.177,11.77
NetD18_1: D18.1 Q12.2 R47.2 R103.1 | length 3.4
  Top Layer w0.3: v1(23.83,11.35) 24.25,11.35 24.28,11.32 24.28,11.21 24.28,11.11 24.31,11.08 R47.2@25.437,11.08 25.423,11.093 25.423,12.047 R103.1@25.41,12.06
  Bottom Layer w0.3: v1(23.83,11.35) 24.214,11.35 24.314,11.45 Q12.2@24.314,11.472
NetD18_2: D18.2 R44.2 | length 1.2
  Top Layer w0.3: D18.2@24.28,9.94 24.29,9.95 R44.2@25.427,9.95
NetLED1_1: LED1.1 R69.1 | length 1.4
  Top Layer w0.27: R69.1@-11.632,30.876 -10.362,30.876 LED1.1@-10.235,30.749
NetR2_2: R2.2 U2.4 | length 2.1
  Top Layer w0.3: R2.2@-8.04,29.46 -8.04,29.51 -7.639,29.911 -7.468,29.911 -7.409,29.97 -7.368,29.97 v1(-7.339,29.999)
  Bottom Layer w0.3: U2.4@-8.27,29.5 -7.945,29.5 -7.534,29.911 -7.468,29.911 -7.409,29.97 -7.368,29.97 v1(-7.339,29.999)
NetR3_2: R3.2 R7.1 | length 1
  Bottom Layer w0.5: R3.2@-13.97,30.22 -13.97,30.17 -13.917,30.117 -13.188,30.117 -13.128,30.177 R7.1@-13.078,30.177
NetR5_2: R5.2 U1.3 | length 1.7
  Bottom Layer w0.3: U1.3@0.941,26.574 1.004,26.637 1.004,28.153 R5.2@1.068,28.217
NetR6_2: R6.2 U1.4 | length 1.8
  Bottom Layer w0.3: U1.4@2.211,26.574 2.211,26.788 2.363,26.94 R6.2@3.74,26.94
NetR12_1: R12.1 R13.1 U4.10 | length 12.4
  Top Layer w0.254: v1(-14.99,13.72) -14.442,13.172 -7.063,13.172 -6.345,13.89 v1(-6.295,13.89)
  Bottom Layer w0.254: U4.10@-15.045,12.207 -15.045,13.475 -15.028,13.493 -15.028,13.683 v1(-14.99,13.72)
  Bottom Layer w0.27: v1(-6.295,13.89) -6.246,13.89 -6.139,13.997 -5.651,13.997 R13.1@-5.536,14.112 R12.1@-5.536,14.874
NetR16_1: R16.1 U3.2 | length 9.2
  Top Layer w0.3: v1(8.446,18.022) 8.475,17.994 8.943,17.994 9.363,17.574 U3.2@10.07,17.574
  S2 w0.27: v1(2.764,18.016) 2.767,18.019 8.443,18.019 v1(8.446,18.022)
  Bottom Layer w0.27: R16.1@1.123,17.83 1.128,17.835 2.535,17.835 2.715,18.016 v1(2.764,18.016)
NetR18_1: R18.1 R21.1 U4.11 | length 12.8
  S2 w0.254: v1(-15.535,11.115) -15.519,11.131 -11.336,11.131 -11.109,11.358 -7.73,11.358 -7.637,11.451 v1(-6.08,11.451)
  Bottom Layer w0.254: U4.11@-15.545,12.207 -15.542,12.204 -15.542,11.123 v1(-15.535,11.115) ; v1(-6.08,11.451) -5.627,11.904 -5.627,12.497 R18.1@-5.536,12.588 ; R21.1@-5.536,13.35 -5.523,13.337 R18.1@-5.523,12.588
NetR20_1: R20.1 U3.3 | length 9.6
  Top Layer w0.3: v1(8.3,17.389) 8.334,17.389 9.418,16.304 U3.3@10.07,16.304
  S2 w0.3: v1(3.02,17.4) 3.026,17.394 8.294,17.394 v1(8.3,17.389)
  Bottom Layer w0.27: R20.1@1.123,16.935 1.182,16.994 2.565,16.994 2.971,17.4 v1(3.02,17.4)
NetR33_1: R33.1 U4.20 | length 1.6
  Bottom Layer w0.27: R33.1@-19.01,16.94 -18.95,17 -18.68,17 -18.473,17.207 U4.20@-17.545,17.207
NetR35_1: R35.1 U5.2 | length 24.3
  Top Layer w0.3: v1(21.09,18.47) 21.605,17.955 U5.2@22.77,17.955
  S2 w0.27: v1(1.79,16.38) 1.79,17.91 2.54,18.66 8.82,18.66 9.426,18.054 20.625,18.054 21.041,18.47 v1(21.09,18.47)
  Bottom Layer w0.27: R35.1@1.123,16.041 1.238,16.156 1.542,16.156 1.766,16.38 v1(1.79,16.38)
NetR39_1: R39.1 U5.3 | length 28
  Top Layer w0.3: U5.3@22.77,16.685 22.833,16.748 24.028,16.748 24.56,17.28 v1(24.56,18.43)
  S2 w0.3: v1(2.76,16.41) 2.801,16.41 3.121,16.73 9.68,16.73 10.509,17.559 22.639,17.559 23.51,18.43 v1(24.56,18.43)
  Bottom Layer w0.27: R39.1@1.123,15.146 1.228,15.251 1.601,15.251 v1(2.76,16.41)
NetR50_1: R50.1 U4.44 | length 1.6
  Bottom Layer w0.27: U4.44@-9.045,15.707 -8.187,15.707 -7.67,15.19 R50.1@-7.62,15.19
NetR52_1: R52.1 U6.2 | length 36
  Top Layer w0.3: v1@33.38,18.305 v1(33.38,18.26) 34.04,17.6 35.063,17.6 U6.2@35.089,17.574
  S2 w0.27: v1(2.895,15.645) 3.485,16.235 9.895,16.235 10.695,17.035 32.155,17.035 v1(33.38,18.26)
  Bottom Layer w0.27: R52.1@1.123,14.251 1.238,14.366 1.616,14.366 v1(2.895,15.645)
NetR54_1: R54.1 U6.3 | length 40.5
  Top Layer w0.3: U6.3@34.778,16.305 35.395,16.305 36.35,17.26 v1(36.35,18.44)
  S2 w0.3: v1(3.564,15.446) 3.593,15.475 4.103,15.475 4.369,15.74 10.3,15.74 11.1,16.54 34.45,16.54 v1(36.35,18.44)
  Bottom Layer w0.27: R54.1@1.123,13.356 1.238,13.471 1.589,13.471 v1(3.564,15.446)
NetR62_2: R62.2 R66.1 Rt1.2 | length 30.4
  Top Layer w0.3: R66.1@0.846,4.849 0.848,4.851 0.848,5.758 R62.2@0.85,5.76 2.609,5.76 2.829,5.98 v1(2.87,5.98) ; v1(22.95,10.76) 22.975,10.785 Rt1.2@22.975,11.735
  S2 w0.3: v1(2.87,5.98) 3.83,6.94 3.83,8.98 5.125,10.275 7.495,10.275 7.87,10.65 8.77,10.65 9.6,11.48 12.2,11.48 14.361,9.319 17.371,9.319 18.48,8.21 21.11,8.21 22.95,10.05 v1(22.95,10.76)
NetR68_1: R68.1 R70.2 U7.2 | length 5.7
  S2 w0.3: v1(2.49,10.092) 2.531,10.092 3.17,9.453 v2(3.17,8.38)
  Bottom Layer w0.3: v1(2.49,10.092) 2.49,10.133 2.773,10.416 2.773,10.543 2.932,10.701 3.823,10.701 3.889,10.767 5.187,10.767 R68.1@5.2,10.78 ; v2(3.17,8.38) 3.199,8.351 3.659,8.351 R70.2@3.73,8.28
NetR68_2: R68.2 R71.1 U7.1 | length 2.6
  Bottom Layer w0.3: U7.1@3.876,11.404 U7.1@4.227,11.404 ; R71.1@4.28,12.5 4.28,11.457 U7.1@4.227,11.404 ; R68.2@5.2,11.78 5.18,11.8 4.767,11.8 4.371,11.404 U7.1@4.227,11.404
NetR72_2: R72.2 R77.1 U7.5 | length 1.8
  Bottom Layer w0.3: R77.1@-3.13,9.47 -2.2,9.47 -1.37,9.47 U7.5@-1.36,9.48 ; R77.1@-3.127,9.397 R77.1@-3.127,9.403
NetR81_1: R81.1 R86.2 U9.2 | length 2.4
  Bottom Layer w0.27: U9.2@4.243,5.588 4.292,5.539 5.75,5.539 6.541,5.539 R86.2@6.59,5.49
NetR81_2: R81.2 R90.2 U9.1 | length 2.8
  Bottom Layer w0.27: U9.1@4.243,6.238 4.605,6.238 5.508,6.238 5.75,6.48 R81.2@5.75,6.53
  Bottom Layer w0.3: U9.1@4.605,6.238 4.658,6.291 R90.2@4.658,7.381
NetR83_1: R83.1 R85.2 U9.6 | length 11.3
  Bottom Layer w0.3: R83.1@-1.857,4.957 -0.376,4.957 U9.6@-0.357,4.938 ; R83.1@-1.85,4.82 -1.85,4.23 -1.18,3.56 1.62,3.56 3.02,2.16 3.02,1.63 4.717,-0.067 5.237,-0.067 R85.2@5.27,-0.1